# Altium PCB ESP32 with USBC PCB V1_1.PcbDoc (part 3 of 3)
Units mil, origin at the board's own origin, x right, y up, seen from the top; angles counter-clockwise.
Board outline 2700 x 1000 mil, 4 copper layers (L1, L2, L3, L4), stack 61.583 mil thick; 64 components, 73 nets, 299 pads, 160 vias.
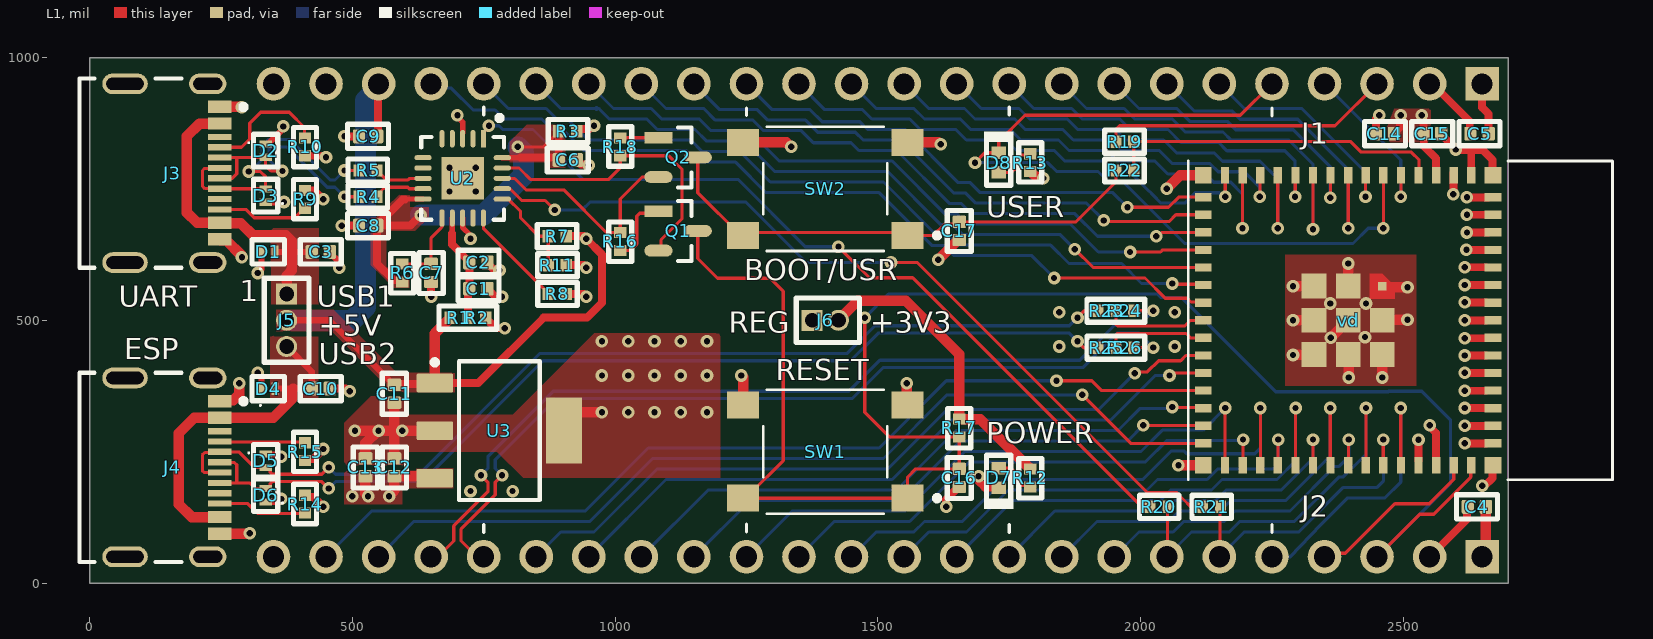
[diagram p0: L1 view]

## Via types
v1: diameter 24, hole 12, L1 to L4, tented both sides, 160 vias

## Nets (pads, with @x,y where several pads share a name; then routed paths per layer and width w, separated by ;. In a path a pad name is that pad's centre, name@x,y a point inside that pad or via, vN(x,y) a via of type N, cw(c..) or ccw(c..) an arc to the next point about the centre after c; other vN are vias at no path point) (continued)
"CONN1 USB_N": (continued)
  L4 w6.03: v1(367,784) 363.01,784 342.01,805 342.01,826.47 345.55,830 375.06,830 452.08,752.99 467.01,752.99 v1(485,735)
"CONN1 USB_P": D3.2 J3.A6 J3.B6 R5.1 | length 529.4
  L1 w6.03: J3.A6 246.86,788.99 218.99,788.99 215,785 215,755 219.49,750.51 247.52,750.51 J3.B6 247.83,750.2 334.8,750.2 D3.2 ; v1(303,783) 324.93,783 335,772.93 335,757 ; v1(485,785) R5.1
  L4 w6.03: v1(303,783) 305.99,783 327.99,805 327.99,832.28 339.74,844.03 380.88,844.03 457.89,767.01 467.01,767.01 v1(485,785)
"CONN2 USB_N": D5.2 J4.A7 J4.B7 R23.1 | length 1931.4
  L1 w6.03: J4.A7 218.3,210.24 214.76,213.77 214.76,243.73 219.5,248.47 246.5,248.47 J4.B7 283.87,249.61 313.47,220 D5.2 339.92,220 343.8,216.13 343.8,210.55 347.33,207.01 442.01,207.01 v1(455,220) ; v1(1880,505) 1893,518 R23.1
  L4 w6.03: v1(455,220) 467.99,207.01 627.17,207.01 857.14,436.99 1442.14,436.99 1494.67,489.51 1864.51,489.51 v1(1880,505)
"CONN2 USB_P": D6.2 J4.A6 J4.B6 R25.1 | length 1892.8
  L1 w6.03: J4.B6 280.08,190.55 ; J4.A6 248.35,229.21 275.79,229.21 280.08,224.92 280.08,190.55 ; v1(455,180) 442.01,192.99 347.33,192.99 343.8,189.45 343.8,183.87 339.92,180 D6.2 315,180 304.45,190.55 280.08,190.55 ; v1(1880,460) 1893,447 R25.1@1918.98,447
  L4 w6.03: v1(455,180) 467.99,192.99 632.99,192.99 862.95,422.95 1447.95,422.95 1500.49,475.49 1864.51,475.49 v1(1880,460)
DTR_FTDI: Q2.2 R16.2 U2.18 | length 421
  L1 w6: U2.18 785.64,769.77 808.81,769.77 830.59,748 902.52,748 983.51,667.01 R16.2 1010,730.87 1051.73,772.6 Q2.2
ESP_USB_N: R23.2 R24.2 vd.23 | length 197.9
  L1 w6.03: R24.2 1953,492.56 1956.53,489.03 2084.03,489.03 2094.52,499.52 2118.97,499.52 vd.23
ESP_USB_P: R25.2 R26.2 vd.24 | length 194.9
  L1 w6.03: R26.2 1952.99,471.47 1956.52,475 2086.54,475 2095,466.54 vd.24
"FTDI USB_N": R4.2 U2.9 | length 98.3
  L1 w6.03: R4.2 554.62,742.61 554.62,746.05 561.71,753.14 605.69,753.14 608.52,750.32 610,750.32 U2.9
"FTDI USB_P": R5.2 U2.8 | length 96.8
  L1 w6.03: R5.2 547.01,783.82 554.62,776.2 555.8,776.2 564.84,767.17 606.17,767.17 609,770 U2.8
FTDI_RESET: C7.2 R6.2 U2.11 | length 151
  L1 w6: R6.2 595.1,607.11 649.9,607.11 C7.2 650,656.82 668.18,675 670.63,677.45 U2.11
GND: C1.1 C2.1 C3.1 C4.1 C5.1 C6.1 C7.1 C8.1 C9.1 C10.1 C11.1 C12.1 C13.1 C14.1 C15.1 C16.1 C17.1 D1.1 D2.1 D3.1 D4.1 D5.1 D6.1 D7.1 J1.1 J1.23 J2.2 J2.24 J3.A1B12 J3.B1A12 J3.S1 J3.S2 J3.S3 J3.S4 J4.A1B12 J4.B1A12 J4.S1 J4.S2 J4.S3 J4.S4 R8.1 R9.1 R10.1 R11.1 R14.1 R15.1 SW1.3 SW1.4 SW2.3 SW2.4 U2.3 U2.13 U2.21 U3.2 U3.4 vd.1 vd.2 vd.42 vd.43 vd.46 vd.47 vd.48 vd.49 vd.50 vd.51 vd.52 vd.53 vd.54 vd.55 vd.56 vd.57 vd.58 vd.59 vd.60 vd.61 vd.62 vd.63 vd.64 vd.65 vd.66 vd.67 vd.68 vd.69 vd.70 vd.71 vd.72 vd.73 | length 3633.5
  L1 w10.01: v1(700,890) 700,886.96 710,876.96 U2.3@710,856.94 ; U2.13 710,676.83 725,661.83 v1(725,655)
  L1 w12: v1(320,400) 327.2,392.8 D4.1 ; v1(320,590) 327.2,597.2 D1.1 ; D6.1 359.41,154.41 v1(365,160) ; D5.1 335.89,244.7 360.3,244.7 v1(365,240) ; D3.1 335.3,724.7 369.7,724.7 v1(370,725) ; D2.1 339.92,835.59 366.56,862.23 366.56,866.56 v1(368.85,868.85) ; C3.1 457.2,628.62 475,610.83 v1(475,600)
  L1 w15: R14.1 413.13,163.88 426.3,163.88 445,145.18 v1(445,145) ; R15.1 413.13,236.12 426.3,236.12 445,254.82 v1(445,255) ; R10.1 444.57,812.99 447.56,810 v1(450,810) ; R9.1@410.44,746.57 428.43,746.57 v1(445,730) ; C10.1 487.56,370 492.56,365 v1(495,365) ; v1(480,680) C8.1 ; v1(485,850) C9.1 ; v1(650,545) C7.1 ; C1.1 757.2,558.62 761.52,554.31 762.89,554.31 772.2,545 v1(785,545) ; C2.1 757.2,608.62 769.1,596.72 778.28,596.72 v1(780,595) ; R8.1 940,550 v1(945,545) ; R11.1 940,605 v1(945,600) ; C6.1 927.2,803.62 931.52,799.31 932.89,799.31 935.48,796.72 948.28,796.72 v1(950,795) ; v1(1630,145) 1630,159.17 1653.62,182.8 C16.1 ; v1(1691.72,203.28) 1691.72,193.56 1703.29,182 1729.3,182 D7.1 ; C14.1 2447.8,883.8 v1(2454,890) ; vd.42@2528.78,232.63 v1(2528.78,272.78) ; J2.2 2621.35,121.35 2621.35,143.56 C4.1 ; v1(2550,300) 2550,297.56 2561.78,285.78 vd.43@2561.78,232.63 ; C15.1 2572.2,853.62 2600,825.83 v1(2600,825) 2600.69,824.31 2625.69,824.31 ; v1@2595.22,740.22 vd.2@2595.22,780.37 ; v1@2617.22,265.78 vd.46@2657.37,265.78 ; v1@2617.22,298.78 vd.47@2657.37,298.78 ; v1@2617.22,332.78 vd.48@2657.37,332.78 ; v1@2617.22,365.78 vd.49@2657.37,365.78 ; v1@2617.22,399.78 vd.50@2657.37,399.78 ; v1@2617.22,432.78 vd.51@2657.37,432.78 ; v1@2617.22,465.78 vd.52@2657.37,465.78 ; v1@2617.22,499.78 vd.53@2657.37,499.78 ; v1@2617.22,533.78 vd.54@2657.37,533.78 ; v1@2617.22,566.78 vd.55@2657.37,566.78 ; v1@2617.22,600.78 vd.56@2657.37,600.78 ; v1@2620.22,633.78 vd.57@2660.37,633.78 ; v1@2621.22,666.78 vd.58@2661.37,666.78 ; v1@2621.22,700.78 vd.59@2661.37,700.78 ; v1@2621.22,733.78 vd.60@2661.37,733.78 ; vd.1 2629.29,820.71 2625.69,824.31 ; v1(2650,185) 2655,185 2670,200 2670,223.78 vd.65 ; J1.1 2650,905 2662.2,892.8 C5.1 ; vd.62 2670,776.22 2670,805 2650.69,824.31 2625.69,824.31
  L1 w20: J4.B1A12 304.09,94.09 v1(305,95) ; J4.A1B12 249.45,347.87 273.28,347.87 285,359.59 v1(285,380) ; J3.B1A12 249.45,652.13 260.28,652.13 289.23,623.17 289.23,620.77 v1(290,620) ; J3.A1B12 289.09,905.91 v1(290,905) ; v1(505,290) v1@548.92,290 ; C13.1 525,266.08 v1@548.92,290 ; C12.1 580,290 ; C11.1 580,290 ; U3.2 v1(595,290) 580,290 ; U3.4 903.03,300.55 927.48,325 v1(975,325) ; v1(1240,395) 1243.5,391.5 SW1.4 ; SW2.4 1325.33,838.58 1333.92,830 v1(1335,830) ; v1(1555,380) 1555,340.08 SW1.3 ; SW2.3 1615.33,838.58 1618.92,835 v1(1620,835) ; v1(1615,615) 1650.98,650.98 1653.19,650.98 C17.1 ; v1(2050,750) 2075.59,775.59 vd.63 ; v1(2072,224) 2072.2,224.2 2119.24,224.2 vd.64 ; v1(2290,434) vd.73@2330.04,434 ; v1(2290,500) vd.72@2330.04,500 ; v1(2290,565) 2330.04,565 vd.71 ; v1(2362,467) vd.61 ; vd.69@2395,567.96 v1(2395,608) ; v1(2396,391) vd.70@2396,431.04 ; v1(2460,391) vd.68@2460,431.04 ; vd.67@2467.96,501 v1(2508,501) ; 2467.96,563 v1(2508,563) ; v1@548.92,290 v1(550,290) 580,290
  other v1: 725,175 805,175 2617,266 2617,299 1025,325 1075,325 1125,325 1175,325 2617,333 2617,366 975,395 1025,395 1075,395 1125,395 1175,395 2617,400 2617,433 1845,450 2065,450 975,460 1025,460 1075,460 1125,460 1175,460 2617,466 2427,468 2617,500 1845,515 2065,515 2361,532 2429,532 2617,534 2617,567 2617,601 2620,634 2621,667 2621,701 2621,734 2595,740 685,745 735,745 685,790 735,790
GPIO0: R19.2 R22.2 vd.4 | length 642.4
  L1 w6: R22.2 R19.2 2400,840 2420,820 2515,820 2530,805 2530,776.69 vd.4
GPIO1: J1.4 vd.5 | length 315.8
  L1 w6: v1(2495,735) 2495.22,735.22 2495.22,775.37 vd.5
  L4 w6: J1.4 2495,805 v1(2495,735)
GPIO2: D8.1 J1.5 vd.6 | length 1593
  L1 w6: v1(1685,800) 1703.7,818.7 D8.1 1730,840 1780,890 2190,890 J1.5 ; v1(2462.04,675.04) vd.6
  L4 w6: v1(1685,800) 1823.18,800 1840.18,783 1919.01,783 1939.01,763 1967,763 2083.96,646.04 2404.22,646.04 2433.22,675.04 v1(2462.04,675.04)
GPIO3: J1.6 vd.7 | length 434.7
  L1 w6: v1@2428.22,735.22 vd.7@2428.22,775.37
  L4 w6: J1.6 2197,903 2307,903 2428,782 v1(2428,735)
GPIO4: J1.7 vd.8 | length 624.9
  L1 w6: v1(2395.04,675.04) v1(2395.04,675.04) vd.8
  L4 w6: J1.7 2101.64,898.36 2173.36,898.36 2189.07,882.64 2299.07,882.64 2395.04,786.68 v1(2395.04,675.04)
GPIO5: J1.8 vd.9 | length 575.9
  L1 w6: v1@2361.22,733.22 vd.9@2361.22,773.37
  L4 w6: J1.8 1997,903 2068.72,903 2093.36,878.36 2165.07,878.36 2180.79,862.64 2290.79,862.64 2361,792.43 v1(2361,733)
GPIO6: J1.9 vd.10 | length 766
  L1 w6: v1(2328.04,673.04) vd.10@2328.04,773.59
  L4 w6: J1.9 1897,903 1968.72,903 1988.72,883 2060.43,883 2085.07,858.36 2156.79,858.36 2172.5,842.64 2282.5,842.64 2328.04,797.11 v1(2328.04,673.04)
GPIO7: J1.10 vd.11 | length 713
  L1 w6: v1@2294.22,735.22 vd.11@2294.22,775.37
  L4 w6: J1.10 1797,903 1868.72,903 1888.72,883 1960.43,883 1980.43,863 2052.15,863 2076.79,838.36 2148.51,838.36 2164.22,822.64 2274.22,822.64 2294,802.86 v1(2294,735)
GPIO8: J1.11 vd.12 | length 880.5
  L1 w6: v1(2261.04,675.04) vd.12@2261.04,775.59
  L4 w6: J1.11 1697,903 1768.72,903 1788.72,883 1860.43,883 1880.43,863 1952.15,863 1972.15,843 2043.86,843 2068.51,818.36 2140.22,818.36 2155.94,802.64 2227.36,802.64 2261.04,768.96 v1(2261.04,675.04)
GPIO9: J1.12 vd.13 | length 816.8
  L1 w6: v1@2227.22,735.22 vd.13@2227.22,775.37
  L4 w6: J1.12 1597,903 1665,903 1685,883 1760.43,883 1780.43,863 1852.15,863 1872.15,843 1943.86,843 1963.86,823 2035.58,823 2060.22,798.36 2131.94,798.36 2147.65,782.64 2197.36,782.64 2226.91,753.09 2226.91,735.09 v1(2227,735)
GPIO10: J1.13 vd.14 | length 996.6
  L1 w6: v1(2194.04,675.04) vd.14@2194.04,775.59
  L4 w6: J1.13 1497,903 1568.72,903 1588.72,883 1656.72,883 1676.72,863 1752.15,863 1772.15,843 1843.86,843 1863.86,823 1935.58,823 1955.58,803 2027.29,803 2051.94,778.36 2123.65,778.36 2139.37,762.64 2171.54,762.64 2194.04,740.14 v1(2194.04,675.04)
GPIO11: J1.14 vd.15 | length 956.9
  L1 w6: v1@2161.22,735.22 vd.15@2161.22,775.37
  L4 w6: J1.14 1399.14,900.86 1470.86,900.86 1488.72,883 1560.43,883 1580.43,863 1648.43,863 1668.43,843 1743.86,843 1763.86,823 1835.58,823 1855.58,803 1927.29,803 1947.29,783 1979.14,783 1985,777.14 1985,776.82 2016.82,745 2017.14,745 2023,739.14 2023,738.82 2038.82,723 2084.37,723 2104.01,742.64 2149.57,742.64 2157.21,735 v1(2161,735)
GPIO12: J1.15 vd.16 | length 974.8
  L1 w6: v1(1975,715) 2053.18,715 2072.44,734.25 vd.16
  L4 w6: J1.15 1299.14,900.86 1370.86,900.86 1393.93,877.79 1465.64,877.79 1480.43,863 1552.15,863 1653.15,762 1675.89,762 1694.89,743 1947,743 v1(1975,715)
GPIO13: J1.16 vd.17 | length 1083.3
  L1 w6: v1(1930,690) 1932,688 2054.47,688 2067.26,700.79 vd.17
  L4 w6: J1.16 1199.14,900.86 1270.86,900.86 1290.86,880.86 1362.57,880.86 1385.64,857.79 1457.36,857.79 1472.15,843 1543.86,843 1644.86,742 1667.6,742 1686.6,723 1897,723 v1(1930,690)
GPIO14: J1.17 vd.18 | length 1192.6
  L1 w6: v1(2030,660) 2033.79,660 2041.11,667.32 vd.18
  L4 w6: J1.17 1097,903 1168.72,903 1190.86,880.86 1262.57,880.86 1282.57,860.86 1354.29,860.86 1377.36,837.79 1449.08,837.79 1463.86,823 1535.58,823 1636.58,722 1659.32,722 1678.32,703 1875,703 1918,660 v1(2030,660)
GPIO15: J1.18 vd.19 | length 1303.6
  L1 w6: v1(1980,630) 2038.18,630 2042.04,633.86 vd.19
  L4 w6: J1.18 997,903 1068.72,903 1088.72,883 1160.43,883 1182.57,860.86 1254.29,860.86 1312.15,803 1527.29,803 1628.29,702 1651.04,702 1670.04,683 1866.72,683 1919.72,630 v1(1980,630)
GPIO16: J1.19 vd.20 | length 1414.3
  L1 w6: v1(1875,635) 1909.61,600.39 vd.20
  L4 w6: J1.19 894.07,905.93 897,903 963,903 963.11,903.11 964.46,903.11 968.61,903.11 971.54,900.18 988.72,883 1060.43,883 1080.43,863 1152.15,863 1174.29,840.86 1246.01,840.86 1303.86,783 1519.01,783 1620.01,682 1642.75,682 1661.75,663 1847,663 v1(1875,635)
GPIO17: J1.20 vd.21 | length 1528.1
  L1 w6: v1(2060,570) 2061.54,568.46 2117.91,568.46 vd.21
  L4 w6: J1.20 797,903 868.72,903 888.72,883 908.82,883 948.82,843 1143.86,843 1166.01,820.86 1237.72,820.86 1295.58,763 1510.73,763 1611.73,662 1634.47,662 1653.47,643 1828.82,643 1863.82,608 1963.82,608 2001.82,570 v1(2060,570)
GPIO18: J1.21 vd.22 | length 1642
  L1 w6: v1(1835.39,580.39) 2008.39,580.39 2046.79,542 2088.63,542 2095.89,534.74 2118.17,534.74 vd.22
  L4 w6: J1.21 658.23,941.77 688.23,941.77 730,900 771.72,900 788.72,883 860.43,883 880.43,863 900.53,863 940.53,823 1135.58,823 1157.72,800.86 1229.44,800.86 1287.29,743 1502.44,743 1603.44,642 1626.18,642 1645.18,623 1792.79,623 v1(1835.39,580.39)
GPIO21: J2.19 vd.25 | length 1428.5
  L1 w6: v1@1989,398 1992.68,401.68 2013.03,401.68 2034.36,423 2076.18,423 2086.25,433.07 vd.25
  L4 w6: J2.19 897,97 960,97 1080,217 1519.01,217 1632.29,330.28 1920.28,330.28 v1(1989,399)
GPIO26: J2.18 vd.26 | length 1314.3
  L1 w6: v1(2055,395) 2058.79,395 2063.39,399.61 vd.26
  L4 w6: J2.18 1097,197 1527.29,197 1640.57,310.28 1942.95,310.28 2027.67,395 v1(2055,395)
GPIO33: J2.17 vd.28 | length 1188.5
  L1 w6: v1(2060,335) 2061.16,333.84 2118.29,333.84 vd.28
  L4 w6: J2.17 1177,177 1535.58,177 1648.86,290.28 1957.09,290.28 1999.14,332.32 2057.32,332.32 v1(2060,335)
GPIO34: J2.16 vd.29 | length 1073.3
  L1 w6: v1(2005,300) 2005.39,299.61 2119.06,299.61 vd.29
  L4 w6: J2.16 1257,157 1543.86,157 1657.14,270.28 1975.28,270.28 v1(2005,300)
GPIO35: J2.15 vd.31 | length 1128.7
  L1 w6: vd.31@2160.96,232.41 v1(2160.96,332.96)
  L4 w6: J2.15 1337,137 1552.15,137 1665.43,250.28 2000.71,250.28 2041.43,291 2119,291 v1(2160.96,332.96)
GPIO36: J2.14 vd.32 | length 977.5
  L1 w6: vd.32@2194.78,232.63 v1@2194.78,272.78
  L4 w6: J2.14 1417,117 1560.43,117 1673.71,230.28 2008.99,230.28 2049.72,271 2193,271 v1(2195,273)
GPIO37: J2.13 vd.33 | length 1044.7
  L1 w6: vd.33@2227.96,232.41 v1(2227.96,332.96)
  L4 w6: J2.13 1497,97 1568.72,97 1588.86,117.14 1660.57,117.14 1740.43,197 2004,197 2058,251 2083.18,251 2088.18,246 2217.6,246 2227.96,256.36 v1(2227.96,332.96)
GPIO38: J2.12 vd.34 | length 871.1
  L1 w6: vd.34@2261.78,232.63 v1@2261.78,272.78
  L4 w6: J2.12 1597.14,97.14 1668.86,97.14 1748.72,177 2012.28,177 2032.28,197 2126.58,197 2146.58,217 2251.29,217 2262,227.71 v1(2262,273)
GPIO39: J2.11 vd.35 | length 921.6
  L1 w6: vd.35@2294.96,232.41 v1(2294.96,332.96)
  L4 w6: J2.11 1757,157 2037.15,157 2057.15,177 2134.86,177 2154.86,197 2259.58,197 2294.96,232.38 v1(2294.96,332.96)
GPIO40: J2.10 vd.36 | length 731.5
  L1 w6: vd.36@2327.78,232.63 v1@2327.78,272.78
  L4 w6: J2.10 1837,137 2045.43,137 2065.43,157 2143.15,157 2163.15,177 2267.86,177 2328,237.14 v1(2328,273)
GPIO41: J2.9 vd.37 | length 782.1
  L1 w6: vd.37@2360.96,232.41 v1(2360.96,332.96)
  L4 w6: J2.9 1917,117 2053.72,117 2073.72,137 2151.43,137 2171.43,157 2276.15,157 2360.96,241.81 v1(2360.96,332.96)
GPIO42: J2.8 vd.38 | length 597.7
  L1 w6: vd.38@2395.78,232.63 v1@2395.78,272.78
  L4 w6: J2.8 1997,97 2062,97 2082,117 2159.72,117 2179.72,137 2284.43,137 2369.43,222 2377.72,222 2396,240.28 v1(2396,273)
GPIO45: J2.5 vd.41 | length 546.1
  L1 w6: vd.41@2494.96,232.41 v1(2494.96,332.96)
  L4 w6: J2.5 2285,50 2343.06,110.78 2394.28,162 2465,162 2494.96,191.96 v1(2494.96,332.96)
GPIO46: J2.4 vd.44 | length 334
  L1 w6: J2.4 2356.73,56.73 2389.73,56.73 2483.96,150.96 2549.49,150.96 2595.83,197.29 vd.44
GPIO47: J2.23 vd.27 | length 1816
  L1 w6: v1(1840,385) 1907,385 1925.86,366.14 vd.27
  L4 w6: J2.23 537,137 943.43,137 1063.43,257 1502.44,257 1630.44,385 v1(1840,385)
GPIO48: J2.22 vd.30 | length 1735.2
  L1 w6: v1(1889,358) 1981.25,265.75 vd.30
  L4 w6: J2.22 617,117 951.72,117 1071.72,237 1510.73,237 1631.73,358 v1(1889,358)
NetD7_2: D7.2 R12.1 | length 84.7
  L1 w6: D7.2 1752.92,218.73 1763.19,208.46 1763.19,191.55 1769.05,185.69 1787.3,185.69 R12.1
NetD8_2: D8.2 R13.1 | length 85.3
  L1 w6: D8.2 1754.29,781.3 1763.13,790.14 1763.13,808.14 1769.17,814.18 1787.17,814.18 R13.1
NetJ3_A5: J3.A5 R10.2 | length 238.9
  L1 w6: J3.A5 289.13,829.13 305,845 305,875 325.85,895.85 380.04,895.85 409.11,866.78 409.11,847.9 R10.2
NetJ3_B5: J3.B5 R9.2 | length 176.5
  L1 w6: J3.B5 297.13,711.02 313.15,695 390.83,695 408.82,712.99 R9.2
NetJ4_A5: J4.A5 R15.2 | length 163.3
  L1 w6: J4.A5 248.54,268.39 408.62,268.39 R15.2
NetJ4_B5: J4.B5 R14.2 | length 169.6
  L1 w6: J4.B5 301.34,151.18 320,132.52 R14.2@409.53,132.52
NetQ1_1: Q1.1 R16.1 | length 134.4
  L1 w6: R16.1 1029.14,632.99 1041.14,645 1041.14,697.91 1047.01,703.78 1078.95,703.78 Q1.1
NetQ2_1: Q2.1 R18.1 | length 72.7
  L1 w6: R18.1 1010.2,847.2 1082.38,847.2 Q2.1
NetR8_2: R8.2 U2.15 | length 195.8
  L1 w6: U2.15 749.37,675 749.37,674.8 872.99,551.18 R8.2
RTS_FTDI: Q1.2 R18.2 U2.19 | length 567.1
  L1 w6: U2.19 817.19,789.68 820,786.87 838.87,768 988,768 1010,790 R18.2 1101.84,812.99 1127.42,787.41 1127.42,693.05 1087.37,653 1087.37,637.39 Q1.2
RXD_FTDI: R20.2 U2.1 | length 1587.3
  L1 w6: U2.1 749.37,856.72 760,867.35 v1(760,870) ; v1(1425,640) 1484.14,580.86 1566.22,580.86 1998.22,148.86 2014.14,148.86 R20.2
  L4 w6: v1(760,870) 779.09,870 786.09,863 820,863 843.82,863 938.82,768 1234.01,768 1362.01,640 v1(1425,640)
TXD_FTDI: R21.2 U2.17 | length 1595.7
  L1 w6: U2.17 799.99,750.32 820,730.3 822.3,728 867,728 v1(885,710) ; v1(1525,610) 1575,610 2013.19,171.81 2068.85,171.81 2080.66,160 2095.66,145 R21.2
  L4 w6: v1(885,710) 937.86,710 952.86,725 1248.73,725 1363.73,610 v1(1525,610)
U0RXD: J2.6 R21.1 vd.40 | length 586.6
  L1 w6: J2.6 2151,51 2151,144 R21.1 ; vd.40@2461.78,232.63 v1@2461.78,272.78
  L4 w6: J2.6 2197,97 2301,97 2386,182 2450,182 2462,194 v1(2462,273)
U0TXD: J2.7 R20.1 vd.39 | length 744.1
  L1 w6: J2.7 2051,51 2051,144 R20.1 ; vd.39@2428.96,232.41 v1(2428.96,332.96)
  L4 w6: J2.7 2097,97 2168.72,97 2188.72,117 2292.72,117 2377.72,202 2386,202 2428.96,244.96 v1(2428.96,332.96)
"VBUS SENSE": R7.1 R11.2 U2.16 | length 180.2
  L1 w6: U2.16 796.72,730.63 820,707.35 820,695 855,660 R7.1 ; R11.2 R7.1 ; R7.1@872.99,661.18 R7.1
pads on no net: J1.24 J3.A8 J3.B8 J4.A8 J4.B8 U2.2 U2.4 U2.5 U2.6 U2.7 U2.14

## Polygon pours and split planes (outlines as drawn)
GND on L1 "GND_L01_P008" (solid, pour order 8): 1197.92,473.9 1200,471.82 1200,200 825,200 775,250 600,250 600,220 485,220 485,305 535,355 600,355 600,320 805,320 960,475 1200,475
GND on L1 "GND_L01_P007" (solid, pour order 7): 2275,625 2275,375 2525,375 2525,625
+5V_VBUS2 on L1 "+5V_VBUS2_L01_P006" (solid, pour order 6): 344.57,375.09 344,375.65 344,471 435,471 435,350 344,350 344,377
+5V_VBUS1 on L1 "+5V_VBUS1_L01_P005" (solid, pour order 5): 393.12,530 350,530 346,530 345,675 436,675 436,530
+5V on L1 "+5V_L01_P004" (solid, pour order 4): 695.33,399.84 695,399.51 695,363 565,363 565,380 560,380 461,479 355,479 355,520 465,520 585,400 695,400
+3V3_REG on L1 "+3V3_REG_L01_P003" (solid, pour order 3): 692,180 595,180 595,150 485,150 485,214 621.77,213.77 621.98,217.7 659.12,218.6 692,218.6
+3V3_FTDI on L1 "+3V3_FTDI_L01_P002" (solid, pour order 2): 608,561.81 580,561.81 535,605 535,695 545,695 589,739 609,737.82 609,715 645,715 645,695 620,670 565,670 565,603 583,585 608,585
+3V3_FTDI on L1 "+3V3_FTDI_L01_P001" (solid, pour order 1): 905,790 875,790 875,801 800,801 800,840 832,872 905,872 905,870
+3V3 on L1 "+3V3_L01_P000" (solid, pour order 0): 2469,839 2552,839 2552,904 2482.57,902.04 2469,868
GND on L2 "GND_L02_P011" (solid, pour order 11): 20,20 20,980 2680,980 2680,20
+3V3_REG on L2 "+3V3_REG_L02_P010" (solid, pour order 10): 478.98,223.17 480,222.16 480,145 665,145 665,225
+3V3 on L2 "+3V3_L02_P009" (solid, pour order 9): 2680,20 2680,980 900,980 900,740 1040,600 1360,600 1360,560 1400,520 1400,480 1460,480 1460,640 1520,700 1880,700 1920,740 2020,740 2080,800 2520,800 2520,620 2540,600 2540,320 2420,200 2300,200 2300,20
GND on L3 (split plane): 2699.95,0.05 0.05,0.05 0.05,999.95 2699.95,999.95

## Silkscreen, mask and mechanical layers (free items; w line width, h text height)
Top Overlay:
  lines w6: 750,96 750,111 ; 750,891 750,906 ; 1250,97 1250,112 ; 1250,890 1250,898 1250,904 ; 1750,96.5 1750,100.25 1750,107.75 1750,111.5 ; 1750,890.5 1750,894.25 1750,901.75 1750,905.5 ; 2250,96 2250,111 ; 2250,889 2250,904
  text "J1" at 2306,836 h40
  text "USER" at 1706,696 h40
  text "BOOT/USR" at 1246,576 h40
  text "UART" at 56,526 h40
  text "USB1" at 432,526 h40
  text "REG" at 1216,476 h40
  text "+3V3" at 1486,476 h40
  text "+5V" at 436,471 h40
  text "ESP" at 66,426 h40
  text "USB2" at 436,416 h40
  text "RESET" at 1306,386 h40
  text "POWER" at 1706,266 h40
  text "J2" at 2306,126 h40
Bottom Overlay:
  drawing of 4 lines, arcs and shapes, not listed
  text "NC" at 374,869 h40 r90
  text "GND" at 479,869 h40 r90
  text "5V" at 574,869 h40 r90
  text "IO18" at 679,869 h40 r90
  text "IO17" at 774,869 h40 r90
  text "IO16" at 879,869 h40 r90
  text "IO15" at 974,869 h40 r90
  text "IO14" at 1084,869 h40 r90
  text "IO13" at 1179,869 h40 r90
  text "IO12" at 1284,869 h40 r90
  text "IO11" at 1379,869 h40 r90
  text "IO10" at 1479,869 h40 r90
  text "IO9" at 1574,869 h40 r90
  text "IO8" at 1679,869 h40 r90
  text "IO7" at 1774,869 h40 r90
  text "IO6" at 1879,869 h40 r90
  text "IO5" at 1974,869 h40 r90
  text "IO4" at 2079,869 h40 r90
  text "IO3" at 2174,869 h40 r90
  text "IO2" at 2274,869 h40 r90
  text "IO1" at 2369,869 h40 r90
  text "IO0" at 2474,869 h40 r90
  text "+3V3" at 2569,869 h40 r90
  text "GND" at 2674,869 h40 r90
  text "<---PIN1--->" at 2674,744 h40 r90
  text "YOU DID IT!!" at 2065,585 h70
  text "YAYY!!" at 2064,506 h40
  text "CHITRANSH CHIRANJEEV" at 2064,386 h40
  text "Date of Completion: 14/11/26" at 2064,329.33 h40
  text "+3V3" at 2674,274 h40 r90
  text "USB-" at 669,269 h40 r90
  text "USB+" at 769,269 h40 r90
  text "GND" at 369,264 h40 r90
  text "IO47" at 469,264 h40 r90
  text "IO48" at 569,264 h40 r90
  text "IO21" at 869,264 h40 r90
  text "IO26" at 969,264 h40 r90
  text "IO33" at 1069,264 h40 r90
  text "IO34" at 1169,264 h40 r90
  text "IO35" at 1269,264 h40 r90
  text "IO36" at 1369,264 h40 r90
  text "IO37" at 1469,264 h40 r90
  text "IO38" at 1569,264 h40 r90
  text "IO39" at 1669,264 h40 r90
  text "IO40" at 1769,264 h40 r90
  text "IO41" at 1869,264 h40 r90
  text "IO42" at 1969,264 h40 r90
  text "TXD" at 2069,264 h40 r90
  text "RXD" at 2169,264 h40 r90
  text "IO45" at 2269,264 h40 r90
  text "IO46" at 2369,264 h40 r90
  text "EN" at 2469,264 h40 r90
  text "GND" at 2569,264 h40 r90
Board Shape:
  the board outline again, w10

## Text inside footprints (layer, text, board x,y; h text height)
J1: Bottom Overlay "1" at 2626,1026 h40 r270
J2: Bottom Overlay "1" at 2631,-34 h40 r270
J5: Top Overlay "1" at 286,536 h40